# EAGLE board SMART FIRE FIGHTER (EAGLE 9.7.0)

Size 246.37 x 155.8 mm. Coordinates in mm from the lower left corner, seen from the top.
Outline: 0,0 246.37,0 246.37,155.8 0,155.8 0,0
Copper layers (1*16): Top 0.035mm / dielectric 1.5mm / Bottom 0.035mm
Design rules "default": minimum track width 6mil, minimum drill 0.35mm, track to track 6mil, track to pad 6mil, pad to pad 6mil, via to via 6mil, smd to smd 6mil, copper to edge 40mil, drill to drill 6mil, minimum pad ring 10mil, minimum via ring 8mil, stop-mask expansion 4mil, vias tented up to drill 0mil, thermal gap 10mil

## Footprints (pad centres in the part's own frame; a part is rotated, then mirrored left to right if it is on the bottom)
DIODE-AXIAL = drill 1: 1 -5.08,0; 2 5.08,0
MOTOR = drill 1.118 pad 3.15 octagon: + 2.54,0; - -2.54,0
BATTERY-GENERIC = drill 1.118 pad 3.15 octagon: + 2.54,0; - -2.54,0
PIEZO = drill 1 pad 1.6: 1 -3.5,0; 2 3.5,0
RESAD1016W63L850D250B = drill 0.83 pad 1.43: 1 -5.08,0; 2 5.08,0
TO92 = drill 0.813 octagon: 1 -1.27,0; 2 0,1.905; 3 1.27,0
ARDUINO-UNO-R3-SHIELD = drill 1.016 pad 1.88: 3.3V 24.13,-2.54; 5V 24.13,0; A0 24.13,12.7; A1 24.13,15.24; A2 24.13,17.78; A3 24.13,20.32; A4 24.13,22.86; A5 24.13,25.4; AREF -24.13,-13.97; D2 -24.13,20.32; D3 -24.13,17.78; D4 -24.13,15.24; D5 -24.13,12.7; D6 -24.13,10.16; D7 -24.13,7.62; D8 -24.13,3.81; D9 -24.13,1.27; D10 -24.13,-1.27; D11 -24.13,-3.81; D12 -24.13,-6.35; D13 -24.13,-8.89; GND@0 24.13,2.54; GND@1 24.13,5.08; GND@2 -24.13,-11.43; IOREF 24.13,-7.62; NC 24.13,-10.16; RES 24.13,-5.08; RX -24.13,25.4; SCL -24.13,-19.05; SDA -24.13,-16.51; TX -24.13,22.86; VIN 24.13,7.62

## Placement (x,y rotation side)
D1  DIODEDIODE-AXIAL  [DIODE-AXIAL]  215.43,117.78 270 top
M1  MOTOR_HDR  [MOTOR]  185.81,117.24 270 top
P1  BATTERYGENERIC  [BATTERY-GENERIC]  238.11,57.93 180 top
PIEZO1  PIEZO  [PIEZO]  164.12,142.22 0 top
R1  1k  [RESAD1016W63L850D250B]  60.84,78.7 90 top
T1  NPN  [TO92]  116.46,125.21 0 top
U1  ARDUINO-UNO-R3-SHIELD  [ARDUINO-UNO-R3-SHIELD]  47.88,49.49 270 top
U2  TMP36GT9Z_TO92  [TO92]  139.03,98.73 0 top
U3  TMP36GT9Z_TO92  [TO92]  150.24,6.1 180 top

## Library data of the parts
D1 M1 P1 PIEZO1 R1 U1-U3 = Tinkercad
T1 = Tinkercad; CATEGORY: Transistor; SUB-CATEGORY: BJT; TYPE: NPN

## Nets
M1_-: D1.1 M1.- T1.3
P1+: D1.2 M1.+ P1.+
P1-: P1.- PIEZO1.2 T1.1 U1.GND@0 U1.GND@1 U1.GND@2 U2.1 U3.1
T1_B: R1.2 T1.2
U1_5V: U1.5V U2.3 U3.3
U1_A0: U1.A0 U2.2
U1_A1: U1.A1 U3.2
U1_D5: R1.1 U1.D5
U1_D8: PIEZO1.1 U1.D8

## Tracks (layer width: path | path; a pad name or v marks a point on that pad's centre or on a via)
M1_-  (2 unrouted)
P1+  (2 unrouted)
P1-  (7 unrouted)
T1_B  (1 unrouted)
U1_5V  (2 unrouted)
U1_A0  (1 unrouted)
U1_A1  (1 unrouted)
U1_D5  (1 unrouted)
U1_D8  (1 unrouted)